# Altium PCB royluo-ledboard.PcbDoc
Units mm, origin at the board's own origin, x right, y up, seen from the top; angles counter-clockwise.
Board outline 15 x 15 mm, 2 copper layers (Top Layer, Bottom Layer); 19 components, 12 nets, 51 pads, 8 vias.
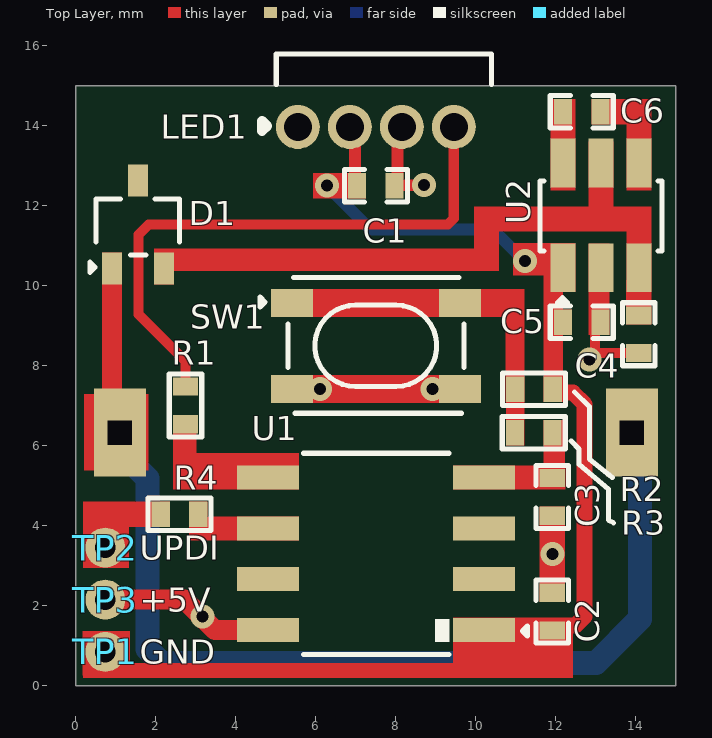
[diagram p0: Top Layer view]
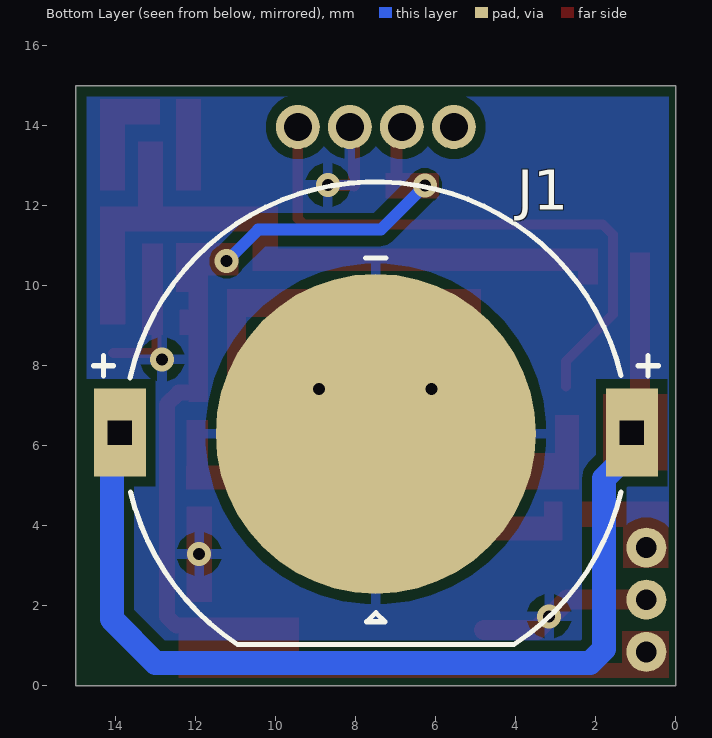
[diagram p1: Bottom Layer view, seen from below]

## Layer stack, top to bottom
Top Solder: solder mask 0.0102, Solder Resist, Dk 3.5
Top Layer: signal copper 0.0356
Dielectric 1: dielectric 0.32, FR-4, Dk 4.8
Bottom Layer: signal copper 0.0356
Bottom Solder: solder mask 0.0102, Solder Resist, Dk 3.5

## Board outline
0,0 0,15 15,15 15,0

## Design rules (kind name [scope] priority, off if disabled: settings)
Clearance [All] p1: gap=0.254 ignorepadtopadclearanceinfootprint=FALSE except(0.127: Via-Fill Via-Poly Via-Region Via-Text; 0.2: THPad-THPad)
ComponentClearance [All] p1: gap=0 collisioncheckmode=3 verticalgap=0 showdistances=FALSE
HoleToHoleClearance [All] p1: gap=0.127 allowstackedmicrovias=TRUE
MinimumSolderMaskSliver [All] p1: minsoldermaskwidth=0.051
NetAntennae [All] p1: netantennaetolerance=0.127
PolygonConnect [All] p1: connectstyle=Relief reliefconductorwidth=0.254 reliefentries=4 polygonreliefangle="90 Angle" airgapwidth=0.254
RoutingVias [All] p1: holewidth=0.3 width=0.6 viastyle="Through Hole" minholewidth=0.3 minwidth=0.6 maxholewidth=0.3 maxwidth=0.6
SilkToSilkClearance [All] p1: silktosilkclearance=0
SilkToSolderMaskClearance [IsPad] p1: minsilkscreentomaskgap=0 clearancetoexposedcopper=TRUE
SolderMaskExpansion [All] p1: expansion=0.102 istentingtop=FALSE
UnRoutedNet [All] p1: checkbadconnections=TRUE
Width [All] p1: maxlimit=0.635 minlimit=0.127 preferedwidth=0.254
23 further rules are at their usual default settings.

## Components (designator, comment, footprint, x,y, rotation, side; value= is the part's Value field where it differs from the comment)
C1 "0.1uF" Cap-0402 7.5,12.5 r180 top value=100nF
C2 "0.1uF" Cap-0402 11.913,1.854 r270 top value=100nF
C3 "0.1uF" Cap-0402 11.913,4.724 r90 top value=100nF
C4 "10uF" Cap-0402 14.072,8.788 r90 top
C5 "10uF" Cap-0402 12.649,9.093 r180 top
C6 "1uF" Cap-0402 12.649,14.351 r0 top
D1 "BAV99W" SOT_323 1.549,11.532 r0 top
J1 "RD-CR1220-2" RD-CR1220-2 7.5,6.3 r180 bottom
LED1 "WS2812D-F5" WS2812D-F5 7.5,13.971 r180 top
R1 "75R" Res-0402 2.743,7.01 r270 top
R2 "10K" Res-0402 11.455,7.417 r0 top
R3 "1K" Res-0402 11.449,6.326 r180 top
R4 "4.7K" Res-0402 2.591,4.293 r180 top
SW1 "TSA016A2518A" TSA016A2518A 7.5,8.5 r0 top locked
TP1 "0.5mm Test Pad" "0.5mm Test Pad"#1 0.737,0.849 r90 top
TP2 "0.5mm Test Pad" "0.5mm Test Pad"#1 0.737,3.454 r90 top
TP3 "0.5mm Test Pad" "0.5mm Test Pad"#2 0.126,2.152 r90 top
U1 "ATTINY412-SSNR" "SOIC-8(0.154\", 3.90mm Width)" 7.5,3.3 r180 top locked
U2 "AP3602AKTR-G1" SOT-23-6 13.132,11.76 r90 top locked

## Footprints (in the part's own frame and the unit in brackets; to place one, negate y for a bottom-side part, rotate by r counter-clockwise, add the part's x,y. Pads: shape width x height; smd on the part's side, far side on the other; paste and mask are expansions set on the pad)
"0.5mm Test Pad"#1 [mm]
  round 1 hole 0.52 mask+0.102: 1(0,0)
"0.5mm Test Pad"#2 [mm]
  round 1 hole 0.52 mask+0.102: 1(0,-0.611)
Cap-0402 [mil]
  rect 18x25 smd mask+2.36: 1(-18.5,0) 2(18.5,0)
  silkscreen extent -31,-16 31,16, body extent -20,-10 20,10, height 19
RD-CR1220-2 [mm]
  rect 1.3x2.2 hole 0.6 square: 1(-6.4,0.027) 2(6.4,0.027)
  round 8 smd: 3(0,0)
  silkscreen extent -7.06,-5.27 7.06,6.3, body extent -6.4,-5.25 6.4,6.45, height 4.2
Res-0402 [mil]
  rect 18x25 smd mask+2.17: 1(-18.5,0) 2(18.5,0)
  silkscreen extent -32,-17 32,16, body extent -23,-11 23,11, height 16
"SOIC-8(0.154\", 3.90mm Width)" [mm]
  rect 1.55x0.6 smd: 1(-2.7,1.905) 2(-2.7,0.635) 3(-2.7,-0.635) 4(-2.7,-1.905) 5(2.7,-1.905) 6(2.7,-0.635) 7(2.7,0.635) 8(2.7,1.905)
  silkscreen extent -3.79,-2.51 1.8,2.51, body extent -3.01,-2.45 3.01,2.45, height 1.63
SOT-23-6 [mm]
  rect 1.22x0.62 smd: 1(-1.31,0.95) 2(-1.31,0) 3(-1.31,-0.95) 4(1.31,-0.95) 5(1.31,0) 6(1.31,0.95)
  silkscreen extent -2.18,-1.52 0.86,1.52, body extent -1.5,-1.5 1.5,1.5, height 1.47
SOT_323 [mm]
  rect 0.5x0.8 smd: 1(-0.65,-1.1) 2(0.65,-1.1) 3(0,1.1)
  silkscreen extent -1.19,-1.19 1.04,0.64, body extent -1.05,-1.15 1.05,1.15, height 1
TSA016A2518A [mm]
  rect 1.05x0.7 smd paste+0 mask+0.051: 1(-2.1,1.075) 2(2.1,1.075) 3(-2.1,-1.075) 4(2.1,-1.075)
  silkscreen extent -2.9,-1.69 2.2,1.71, body extent -2.25,-1.7 2.25,1.7, height 2.5
WS2812D-F5 [mm]
  round 1.1 hole 0.7 paste+0 mask+0.051: 1(1.95,0) 2(0.65,0) 3(-0.65,0) 4(-1.95,0)
  silkscreen extent -2.9,-1.83 2.84,0.1, body extent -2.9,-13.05 2.51,0.25, height 3.4

## Part data
C1 C2 C3: library part GRM155R71C104KA88D, "CAP CER 0.1UF 16V X7R 0402", Case Code (Imperial)=0402, Case Code (Metric)=1005, Dielectric=X7R, Dielectric Material=Ceramic, Insulation Resistance=10GR, LCSC Part Number=C71629, Manufacturer=Murata, Max Operating Temperature=125°C, Min Operating Temperature=-55°C, Package Quantity=1, Tolerance=10%, Voltage=16V, Case/Package=0402, Category="Ceramic Capacitors", ComponentLink1Description=https://datasheet.ciiva.com/129/grm155r71c104ka88-01-129739.pdf?src-supplier=Digi-Key, ComponentLink1URL=https://datasheet.ciiva.com/129/grm155r71c104ka88-01-129739.pdf?src-supplier=Digi-Key, ComponentLink2Description=https://datasheet.ciiva.com/129/grm155r71c104ka88-01-129740.pdf?src-supplier=Digi-Key, ComponentLink2URL=https://datasheet.ciiva.com/129/grm155r71c104ka88-01-129740.pdf?src-supplier=Digi-Key, ComponentLink3Description=https://datasheet.ciiva.com/18102/getdatasheetpartid-85307-18102905.pdf?src-supplier=Verical, ComponentLink3URL=https://datasheet.ciiva.com/18102/getdatasheetpartid-85307-18102905.pdf?src-supplier=Verical, ComponentLink4Description=https://datasheet.ciiva.com/29199/454098-da-01-en-vs-kondensator-0402-29199799.pdf?src-supplier=Conrad, ComponentLink4URL=https://datasheet.ciiva.com/29199/454098-da-01-en-vs-kondensator-0402-29199799.pdf?src-supplier=Conrad, ComponentLink5Description=https://datasheet.ciiva.com/7937/4360-7937615.pdf?src-supplier=Element14, ComponentLink5URL=https://datasheet.ciiva.com/7937/4360-7937615.pdf?src-supplier=Element14, ComponentLink6Description=https://datasheet.ciiva.com/14116/grmseries-highdielectrictype-eng-14116878.pdf?src-supplier=Distrelec, ComponentLink6URL=https://datasheet.ciiva.com/14116/grmseries-highdielectrictype-eng-14116878.pdf?src-supplier=Distrelec, ComponentLink7Description=https://datasheet.ciiva.com/14103/grmseries-highdielectrictype-eng-14103750.pdf?src-supplier=Distrelec, ComponentLink7URL=https://datasheet.ciiva.com/14103/grmseries-highdielectrictype-eng-14103750.pdf?src-supplier=Distrelec, ComponentLink8Description=https://datasheet.ciiva.com/28534/4360-28534127.pdf?src-supplier=Element14, ComponentLink8URL=https://datasheet.ciiva.com/28534/4360-28534127.pdf?src-supplier=Element14, ComponentLink9Description=https://datasheet.ciiva.com/28534/4360-28534133.pdf?src-supplier=Element14, ComponentLink9URL=https://datasheet.ciiva.com/28534/4360-28534133.pdf?src-supplier=Element14, ComponentLink10Description=https://datasheet.ciiva.com/16199/product-16199000.pdf?src-supplier=Future+Electronics, ComponentLink10URL=https://datasheet.ciiva.com/16199/product-16199000.pdf?src-supplier=Future+Electronics, Depth=0.5mm, Height=0.5mm, Item Type=Capacitor, Lead Free="Lead Free", Length=1mm, Manufacturer Part Number=GRM155R71C104KA88D, Material=Ceramic, Mounting Technology="Surface Mount", Packaging="Tape and Reel", Pins=2, Pricing 1="10000=0.00480, 30000=0.00470, 100000=0.00350, 250000=0.00330 (USD)", Radiation Hardening=No, RoHS=Yes, RoHS Compliant=Yes, Series=GRM, Stock 1=1690322, Supplier 1="Arrow Electronics", Supplier Part Number 1=GRM155R71C104KA88D, Termination=SMD/SMT, Thickness=0.022inch, Voltage Rating=16V, Voltage Rating (DC)=16V, Width=0.02inch
C4 C5: library part CL05A106MP5NUNC, "CAP CER 10UF 10V X5R 0402", Case Code (Imperial)=0402, Case Code (Metric)=1005, Dielectric=X5R, LCSC Part Number=C315248, Manufacturer=Samsung, Max Operating Temperature=85°C, Min Operating Temperature=-55°C, Package Quantity=1, Tolerance=20%, Voltage Rating=10V, Capacitance=10uF, Case/Package=0402, Category="Ceramic Capacitors", ComponentLink1Description=https://datasheet.ciiva.com/25721/cl05a106mp5nunc-25721584.pdf?src-supplier=Digi-Key, ComponentLink1URL=https://datasheet.ciiva.com/25721/cl05a106mp5nunc-25721584.pdf?src-supplier=Digi-Key, ComponentLink2Description=https://datasheet.ciiva.com/26838/getdatasheetpartid-745310-26838170.pdf?src-supplier=Verical, ComponentLink2URL=https://datasheet.ciiva.com/26838/getdatasheetpartid-745310-26838170.pdf?src-supplier=Verical, Construction=Flat, Contact Plating=Tin, Depth=0.5mm, Item Type=Capacitor, Lead Free="Lead Free", Length=1mm, Manufacturer Part Number=CL05A106MP5NUNC, Mount="Surface Mount", Packaging="Tape and Reel", Pricing 1="10000=0.02537 (USD)", Radiation Hardening=No, RoHS=Yes, RoHS Compliant=Yes, Series=CL, Stock 1=1729850, Supplier 1=Avnet, Supplier Part Number 1=CL05A106MP5NUNC, Termination=Wraparound, Thickness=0.028inch, Width=0.02inch
C6: library part CC0402KRX5R7BB105, "CAP CER 1UF 16V X5R 0402", Case Code (Imperial)=0402, Case Code (Metric)=1005, Dielectric=X5R, LCSC Part Number=C325464, Manufacturer=Yageo, Max Operating Temperature=85°C, Min Operating Temperature=-55°C, Supplier Part Number 1=311-1691-6-ND, Tolerance=10%, Voltage Rating=16V, Capacitance=1uF, Case/Package=0402, ComponentLink1Description=http://www.yageo.com/documents/recent/UPY-GPHC_X5R_4V-to-50V_12.pdf?src-supplier=Avnet+Europe, ComponentLink1URL=http://www.yageo.com/documents/recent/UPY-GPHC_X5R_4V-to-50V_12.pdf?src-supplier=Avnet+Europe, Composition=Ceramic, Depth=0.5mm, Halogen Free="Halogen Free", Height=0.5mm, Item Type=Capacitor, Lead Free="Lead Free", Length=1mm, Manufacturer Part Number=CC0402KRX5R7BB105, Mount="Surface Mount", Packaging="Tape and Reel", Pricing 1="1=0.36, 10=0.252, 100=0.1512, 500=0.1134, 1000=0.09576, 2500=0.09072, 5000=0.08568 (USD)", Radiation Hardening=No, Stock 1=1405667, Supplier 1=Digi-Key, Termination=SMD/SMT, Thickness=0.022inch, Voltage Rating (DC)=16V, Weight=2.3E-05oz, Width=0.02inch
D1: "75V Dual 1.25V@150mA 4ns 150mA SOT-323 Switching Diode ROHS", LCSC Part Number=C5240626, Manufacturer=MSKSEMI, Package=SOT-323, ComponentLink1Description=LCSC, ComponentLink1URL=https://www.lcsc.com/product-detail/Switching-Diode_MSKSEMI-BAV99W_C5240626.html, Item Type=Diode, Manufacturer Part Number=BAV99W
J1: "CR1220 2 cell connector", Manufacturer=Reida, Manufacturer Part Number=RD-CR1220-2
LED1: "Plugin,D=5mm RGB LEDs ROHS", LCSC Part Number=C190565, Manufacturer=Worldsemi, Package=Plugin,D=5mm, ComponentLink1Description=LCSC, ComponentLink1URL=https://jlcpcb.com/partdetail/Worldsemi-WS2812DF5/C190565, Item Type="RGB LED", Manufacturer Part Number=WS2812D-F5
R1: library part RC0402JR-0775RL, "RES 75 OHM 5% 1/16W 0402", Case Code (Imperial)=0402, Case Code (Metric)=1005, LCSC Part Number=C137841, Manufacturer=Yageo, Max Operating Temperature=155°C, Max Power Dissipation=63mW, Min Operating Temperature=-55°C, Power Rating=62.5mW, Resistance Tolerance=5%, Resistor Type="Thick Film", Supplier Part Number=311-75JRCT-ND, Temperature Coefficient=100ppm/°C, Voltage Rating=50V, Case/Package=0402, ComponentLink1Description=https://datasheet.ciiva.com/7983/1018594-7983612.pdf?src-supplier=Element14, ComponentLink1URL=https://datasheet.ciiva.com/7983/1018594-7983612.pdf?src-supplier=Element14, ComponentLink2Description=https://datasheet.ciiva.com/17082/pyu-rc0402-51-rohs-l-6-r-17082239.pdf?src-supplier=Future+Electronics, ComponentLink2URL=https://datasheet.ciiva.com/17082/pyu-rc0402-51-rohs-l-6-r-17082239.pdf?src-supplier=Future+Electronics, Contact Plating=Tin,Lead, Features="Moisture Resistant", Height=0.35mm, Item Type=Resistor, Lead Free="Lead Free", Length=1mm, Manufacturer Part Number=RC0402JR-0775RL, Number of Terminations=2, Packaging="Tape and Reel", Pins=2, Pricing="1=0.1, 10=0.018, 50=0.0102, 100=0.0083, 500=0.00528, 1000=0.00444, 5000=0.00307 (USD)", Reach SVHC Compliant=No, RoHS=Yes, RoHS Compliant=Yes, Series=RC, Stock=2993323, Supplier=Digikey, Termination=SMD/SMT, Tolerance=5%, Voltage Rating (DC)=50V, Width=0.5mm
R2: library part RC0402FR-0710KL, "RES 10K OHM 1% 1/16W 0402", Case Code (Imperial)=0402, Case Code (Metric)=1005, LCSC Part Number=C60490, Manufacturer=Yageo, Max Operating Temperature=155°C, Max Power Dissipation=63mW, Min Operating Temperature=-55°C, Power Rating=62.5mW, Resistance=10kR, Resistance Tolerance=1%, Resistor Type="Thick Film", Supplier Part Number 1=603-RC0402FR-0710KL, Temperature Coefficient=100ppm/°C, Voltage Rating=50V, Case/Package=0402, Category="Chip SMD Resistors", ComponentLink1Description=https://datasheet.ciiva.com/7660/38568-7660787.pdf?src-supplier=Element14, ComponentLink1URL=https://datasheet.ciiva.com/7660/38568-7660787.pdf?src-supplier=Element14, ComponentLink2Description=https://datasheet.ciiva.com/7849/1686128-7849814.pdf?src-supplier=Element14, ComponentLink2URL=https://datasheet.ciiva.com/7849/1686128-7849814.pdf?src-supplier=Element14, ComponentLink3Description=https://datasheet.ciiva.com/7983/1018594-7983486.pdf?src-supplier=Element14, ComponentLink3URL=https://datasheet.ciiva.com/7983/1018594-7983486.pdf?src-supplier=Element14, ComponentLink4Description=https://datasheet.ciiva.com/22747/1018594-22747512.pdf?src-supplier=Element14, ComponentLink4URL=https://datasheet.ciiva.com/22747/1018594-22747512.pdf?src-supplier=Element14, ComponentLink5Description=https://datasheet.ciiva.com/12667/pyu-rc0402-51-rohs-l-6-r-12667067.pdf?src-supplier=Mouser, ComponentLink5URL=https://datasheet.ciiva.com/12667/pyu-rc0402-51-rohs-l-6-r-12667067.pdf?src-supplier=Mouser, ComponentLink6Description=https://datasheet.ciiva.com/7849/1784430-7849813.pdf?src-supplier=Element14, ComponentLink6URL=https://datasheet.ciiva.com/7849/1784430-7849813.pdf?src-supplier=Element14, ComponentLink7Description=https://datasheet.ciiva.com/7849/1784430-7849815.pdf?src-supplier=Element14, ComponentLink7URL=https://datasheet.ciiva.com/7849/1784430-7849815.pdf?src-supplier=Element14, Construction=Rectangular, Depth=0.5mm, Features="Moisture Resistant", Height=0.32mm, Item Type=Resistor, Lead Free="Lead Free", Lead Pitch=0.2mm, Length=1mm, Manufacturer Part Number=RC0402FR-0710KL, Military Standard=Not, Number of Pins=2, Number of Terminations=2, Packaging="Tape and Reel", Pricing 1="1=0.10000, 10=0.01400, 50=0.01400, 100=0.00500, 1000=0.00300, 10000=0.00200 (USD)", REACH SVHC="No SVHC", RoHS=Yes, RoHS Compliant=Yes, Series=RC, Stock 1=18648329, Supplier 1=Mouser, Termination=SMD/SMT, Tolerance=1%, Voltage Rating (DC)=50V, Width=0.5mm, Working Voltage=50V
R3: library part RC0402FR-071KL, "RES 1K OHM 1% 1/16W 0402", Case Code (Imperial)=0402, Case Code (Metric)=1005, LCSC Part Number=C106235, Manufacturer=Yageo, Max Operating Temperature=155°C, Max Power Dissipation=63mW, Min Operating Temperature=-55°C, Power Rating=62.5mW, Resistance=1kR, Resistance Tolerance=1%, Resistor Type="Thick Film", Temperature Coefficient=100ppm/°C, Voltage Rating=50V, Case/Package=0402, Category="Chip SMD Resistors", ComponentLink1Description=https://datasheet.ciiva.com/11819/0900766b80c66297-11819477.pdf?src-supplier=RSComponents, ComponentLink1URL=https://datasheet.ciiva.com/11819/0900766b80c66297-11819477.pdf?src-supplier=RSComponents, ComponentLink2Description=https://datasheet.ciiva.com/7983/1018594-7983502.pdf?src-supplier=Element14, ComponentLink2URL=https://datasheet.ciiva.com/7983/1018594-7983502.pdf?src-supplier=Element14, ComponentLink3Description=https://datasheet.ciiva.com/22747/1018594-22747513.pdf?src-supplier=Element14, ComponentLink3URL=https://datasheet.ciiva.com/22747/1018594-22747513.pdf?src-supplier=Element14, ComponentLink4Description=https://datasheet.ciiva.com/12666/pyu-rc0402-51-rohs-l-6-r-12666741.pdf?src-supplier=Mouser, ComponentLink4URL=https://datasheet.ciiva.com/12666/pyu-rc0402-51-rohs-l-6-r-12666741.pdf?src-supplier=Mouser, ComponentLink5Description=https://datasheet.ciiva.com/7849/1018594-7849869.pdf?src-supplier=Element14, ComponentLink5URL=https://datasheet.ciiva.com/7849/1018594-7849869.pdf?src-supplier=Element14, ComponentLink6Description=https://datasheet.ciiva.com/7849/1018594-7849871.pdf?src-supplier=Element14, ComponentLink6URL=https://datasheet.ciiva.com/7849/1018594-7849871.pdf?src-supplier=Element14, ComponentLink7Description=https://datasheet.ciiva.com/17063/pyu-rc0402-51-rohs-l-6-r-17063193.pdf?src-supplier=Future+Electronics, ComponentLink7URL=https://datasheet.ciiva.com/17063/pyu-rc0402-51-rohs-l-6-r-17063193.pdf?src-supplier=Future+Electronics, Construction=Rectangular, Depth=0.5mm, Features="Moisture Resistant", Height=0.32mm, Item Type=Resistor, Lead Free="Lead Free", Length=1mm, Manufacturer Part Number=RC0402FR-071KL, Military Standard=Not, Number of Pins=2, Number of Terminations=2, Packaging="Tape and Reel", Pricing 1="10000=0.00085, 20000=0.00087, 40000=0.00084, 60000=0.00083, 80000=0.00079, 100000=0.00078, 1000000=0.00076 (USD)", Reach SVHC Compliant=Yes, RoHS=Yes, RoHS Compliant=Yes, Series=RC, Size Code=0402, Stock 1=13030000, Supplier 1=Avnet, Supplier Part Number 1=RC0402FR-071KL, Technology="THICK FILM", Termination=SMD/SMT, Tolerance=1%, Voltage Rating (DC)=50V, Width=0.5mm
R4: library part RC0402FR-074K7L, "RES 4.7K OHM 1% 1/16W 0402", Case Code (Imperial)=0402, Case Code (Metric)=1005, LCSC Part Number=C105871, Manufacturer=Yageo, Max Operating Temperature=155°C, Max Power Dissipation=63mW, Min Operating Temperature=-55°C, Power Rating=62.5mW, Resistance=4.7kR, Resistance Tolerance=1%, Resistor Type="Thick Film", Temperature Coefficient=100ppm/°C, Voltage Rating=50V, Case/Package=0402, Category="Chip SMD Resistors", ComponentLink1Description=https://datasheet.ciiva.com/22661/1686128-22661342.pdf?src-supplier=Element14, ComponentLink1URL=https://datasheet.ciiva.com/22661/1686128-22661342.pdf?src-supplier=Element14, ComponentLink2Description=https://datasheet.ciiva.com/7850/1018594-7850022.pdf?src-supplier=Element14, ComponentLink2URL=https://datasheet.ciiva.com/7850/1018594-7850022.pdf?src-supplier=Element14, ComponentLink3Description=https://datasheet.ciiva.com/7850/1018594-7850023.pdf?src-supplier=Element14, ComponentLink3URL=https://datasheet.ciiva.com/7850/1018594-7850023.pdf?src-supplier=Element14, ComponentLink4Description=https://datasheet.ciiva.com/15215/getdatasheetpartid-328119-15215035.pdf?src-supplier=Verical, ComponentLink4URL=https://datasheet.ciiva.com/15215/getdatasheetpartid-328119-15215035.pdf?src-supplier=Verical, Construction=Rectangular, Depth=0.5mm, Features="Moisture Resistant", Height=0.32mm, Height - Seated (Max)=0.016inch, Item Type=Resistor, Lead Free="Lead Free", Length=1mm, Manufacturer Part Number=RC0402FR-074K7L, Military Standard=Not, Number of Pins=2, Number of Terminations=2, Packaging="Tape and Reel", Pricing 1="10000=0.00085 (USD)", Reach SVHC Compliant=Yes, RoHS=Yes, RoHS Compliant=Yes, Series=RC, Size Code=0402, Stock 1=2420000, Supplier 1=Avnet, Supplier Part Number 1=RC0402FR-074K7L, Termination=SMD/SMT, Tolerance=1%, Voltage Rating (DC)=50V, Width=0.5mm
SW1: "3.35mm 2.5mm Oval button 50mA Brick nogging 4.2mm 180gf 12V SMD Tactile Switches ROHS", LCSC Part Number=C2888427, Manufacturer=BZCN, Package=SMD, ComponentLink1Description=LCSC, ComponentLink1URL=https://jlcpcb.com/partdetail/Bzcn-TSA016A2518A/C2888427, Item Type="Tactile Switch", Manufacturer Part Number=TSA016A2518A
TP1 TP2 TP3: "Test pad"
U1: "IC MCU 8BIT 4KB FLASH 8SOIC", Manufacturer=Microchip, Supplier Part Number=ATTINY412-SSNRCT-ND, Category=Microcontrollers, ComponentLink1Description=http://www.farnell.com/datasheets/2785624.pdf?src-supplier=Farnell, ComponentLink1URL=http://www.farnell.com/datasheets/2785624.pdf?src-supplier=Farnell, ComponentLink2Description=http://www.microchip.com/mymicrochip/filehandler.aspx?ddocname=en599382&src-supplier=Digikey, ComponentLink2URL=http://www.microchip.com/mymicrochip/filehandler.aspx?ddocname=en599382&src-supplier=Digikey, ComponentLink3Description=http://www.microchip.com/mymicrochip/filehandler.aspx?ddocname=en599385&src-supplier=Digikey, ComponentLink3URL=http://www.microchip.com/mymicrochip/filehandler.aspx?ddocname=en599385&src-supplier=Digikey, ComponentLink4Description=https://datasheet.octopart.com/ATTINY412-SSNR-Microchip-datasheet-164410963.pdf?src-supplier=SHENGYU+ELECTRONICS, ComponentLink4URL=https://datasheet.octopart.com/ATTINY412-SSNR-Microchip-datasheet-164410963.pdf?src-supplier=SHENGYU+ELECTRONICS, ComponentLink5Description=https://datasheet.octopart.com/ATTINY412-SSNR-Microchip-datasheet-137472780.pdf?src-supplier=Master+Electronics, ComponentLink5URL=https://datasheet.octopart.com/ATTINY412-SSNR-Microchip-datasheet-137472780.pdf?src-supplier=Master+Electronics, Manufacturer Part Number=ATTINY412-SSNR, Pricing="1=0.58, 25=0.53, 100=0.47 (USD)", RoHS=Yes, Stock=11598, Supplier=Digikey
U2: "IC LED DRVR RGLTR 100MA SOT23-6", LCSC Part Number=C460358, Manufacturer=Diodes, Supplier Part Number=31-AP3602AKTR-G1CT-ND, ComponentLink1Description=https://media.digikey.com/pdf/Data%20Sheets/Diodes%20PDFs/AP3602A_B.pdf?src-supplier=Digikey, ComponentLink1URL=https://media.digikey.com/pdf/Data%20Sheets/Diodes%20PDFs/AP3602A_B.pdf?src-supplier=Digikey, Item Type="LED Drivers", Manufacturer Part Number=AP3602AKTR-G1, Pricing="1=0.48, 10=0.414, 25=0.386, 100=0.3088, 250=0.28676, 500=0.24264, 1000=0.1875 (USD)", RoHS=Yes, Stock=4893, Supplier=Digikey

## Via types
v1: diameter 0.6, hole 0.3, Top Layer to Bottom Layer, tented both sides, 5 vias
v2: diameter 0.6, hole 0.3, Top Layer to Bottom Layer, 3 vias

## Nets (pads, with @x,y where several pads share a name; then routed paths per layer and width w, separated by ;. In a path a pad name is that pad's centre, name@x,y a point inside that pad or via, vN(x,y) a via of type N, cw(c..) or ccw(c..) an arc to the next point about the centre after c; other vN are vias at no path point)
+5V: C1.2 C2.2 C5.2 LED1.2 R2.2 TP1.1 U1.1 U2.1 | length 14.3
  Top Layer w0.3: LED1.2 6.978,13.844 6.978,12.552 C1.2
  Top Layer w0.4: R2.2 11.925,7.355 11.954,7.327 12.43,7.327 12.723,7.033 12.723,1.738 12.489,1.504 12.233,1.504 12.116,1.386 C2.2@12.116,1.384
  Bottom Layer w0.3: v1(6.274,12.506) 7.375,11.405 10.439,11.405 v1(11.227,10.617)
+6V: D1.1 J1.1 J1.2 | length 23.4
  Bottom Layer w0.6: J1.2@0.9,6.327 0.9,6.077 1.791,5.187 1.791,0.925 2.142,0.573 13.004,0.573 14.1,1.669 J1.1@14.1,6.327 ; J1.2@0.9,6.773 J1.2@0.9,6.827
GND: C1.1 C2.1 C3.1 C4.1 C5.1 J1.3 LED1.3 SW1.3 SW1.4 TP3.1 U1.8 U2.2 | length 8.9
  Top Layer w0.254: C5.1 12.98,8.954 12.98,8.395 12.84,8.254 v1(12.84,8.161) 12.933,8.161 13.091,8.319 C4.1
  Top Layer w0.3: LED1.3 8.049,13.87 8.049,12.51 v2(8.699,12.521) ; v2@8.739,12.51 v2@8.75,12.521
  Top Layer w0.5: TP3.1 2.717,2.152 3.474,1.395 U1.8
  other v1: 3.166,1.737 11.916,3.296
  other v2: 6.103,7.425 8.917,7.425
NetC6_1: C6.1 U2.6
NetC6_2: C6.2 U2.4
NetLED1_4: LED1.4 R1.1 | length 14.6
  Top Layer w0.254: R1.1 2.743,8.115 1.568,9.29 1.568,11.277 1.823,11.532 9.298,11.532 9.45,11.684 LED1.4
NetR2_1: R2.1 R3.2 SW1.1 SW1.2
NetR4_2: R4.2 TP2.1
PA1: C3.2 R3.1 U1.4
PA2: R1.2 U1.5
UPDI: R4.1 U1.6
VCC: C4.2 D1.2 U2.3 U2.5
pads on no net: D1.3 LED1.1 U1.2 U1.3 U1.7

## Polygon pours and split planes (outlines as drawn)
GND on Bottom Layer "GND_L02_P-001" (solid, pour order 0): 14.732,14.732 14.732,0.254 0.178,0.254 0.178,14.732

## Other copper
Top Layer:
  rectangle net GND: 12.822,8.776 13.348,11.06
  rectangle net VCC: 13.754,9.03 14.392,10.141
  rectangle net +5V: 11.951,8.776 12.408,9.411
  rectangle net +5V: 11.872,9.84 12.492,11.06
  rectangle net +5V: 10.932,10.26 12.492,11.066
  rectangle net +5V: 5.925,12.183 7.259,12.818
  rectangle net +5V: 11.697,7.099 12.179,11.069
  rectangle net PA1: 11.69,4.966 12.23,6.644
  rectangle net NetR2_1: 10.748,7.099 11.214,9.925
  rectangle net NetR2_1: 10.751,6.009 11.214,7.734
  rectangle net GND: 11.595,2.095 12.23,4.483
  rectangle net VCC: 9.969,11.354 14.392,11.984
  rectangle net VCC: 9.95,10.374 10.578,11.984
  rectangle net VCC: 1.949,10.032 2.449,10.832
  rectangle net VCC: 1.949,10.374 10.575,10.927
  rectangle net VCC: 12.822,11.354 14.392,11.984
  rectangle net VCC: 13.772,9.764 14.392,11.984
  rectangle net VCC: 12.822,11.354 13.447,13.604
  rectangle net +5V: 0.173,0.26 1.351,1.376
  rectangle net +5V: 0.176,0.199 12.433,0.573
  rectangle net +5V: 9.425,0.26 12.433,1.695
  rectangle net NetR4_2: 0.185,2.951 1.325,4.61
  rectangle net NetR4_2: 0.185,3.974 2.349,4.61
  rectangle net UPDI: 2.832,3.635 5.575,4.235
  rectangle net UPDI: 2.832,3.635 3.289,4.61
  rectangle net UPDI: 3.474,3.635 5.575,4.235
  rectangle net PA2: 2.426,5.104 3.018,6.769
  rectangle net PA2: 2.426,4.905 5.575,5.815
  rectangle net +6V: 0.205,5.384 1.823,7.29
  rectangle net +6V: 0.649,5.815 1.149,10.832
  rectangle net PA1: 9.425,4.905 12.246,5.505
  rectangle net +5V: 9.425,1.095 12.433,1.704
  rectangle net GND: 4.875,7.075 10.125,7.775
  rectangle net NetR2_1: 4.875,9.225 10.125,9.925
  rectangle net NetR2_1: 9.075,9.225 11.208,9.925
  rectangle net NetC6_1: 11.872,12.384 12.492,14.668
  rectangle net NetC6_2: 13.772,12.384 14.392,14.668
  rectangle net NetC6_2: 12.89,14.034 14.392,14.668

## Silkscreen, mask and mechanical layers (free items; w line width, h text height)
Top Overlay:
  lines w0.127: 12.386,6.119 12.582,5.92 12.582,5.537 13.314,4.915 13.314,4.145 13.447,4.07 ; 12.471,7.341 12.84,6.98 12.84,5.675 13.411,5.207
  text "UPDI" at 1.599,3.154 h0.6
  text "+5V" at 1.599,1.852 h0.6
  text "GND" at 1.599,0.549 h0.6
Board Outline:
  the board outline again, w0.254